# Altium PCB CM5IO_V2.PcbDoc (part 4 of 4)
Units mm, origin at the board's own origin, x right, y up, seen from the top; angles counter-clockwise.
Board outline 160 x 90 mm, 4 copper layers (F.Cu, In1.Cu, In2.Cu, B.Cu); 77 components, 161 nets, 674 pads, 703 vias.
Unrouted connection lines stored in the file: 47.
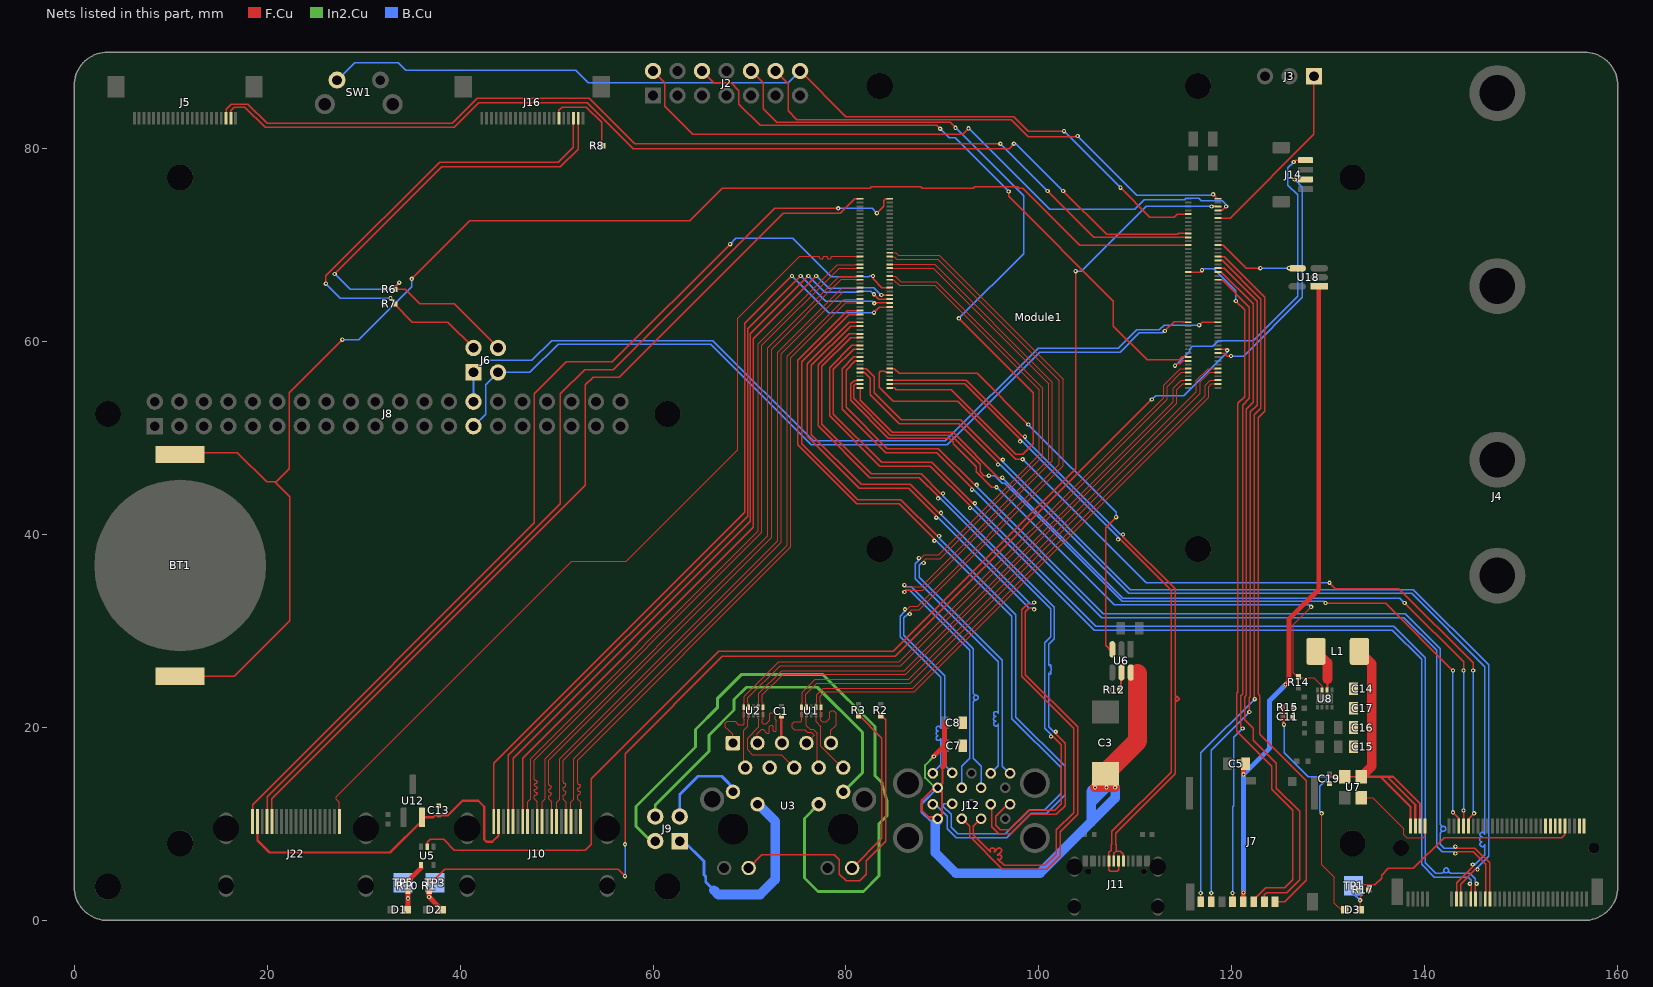
[diagram p5: the nets of this part, all layers, seen from the top]

## Via types
v1: diameter 0.45, hole 0.2, F.Cu to B.Cu, tented both sides, 703 vias

## Nets (pads, with @x,y where several pads share a name; then routed paths per layer and width w, separated by ;. In a path a pad name is that pad's centre, name@x,y a point inside that pad or via, vN(x,y) a via of type N, cw(c..) or ccw(c..) an arc to the next point about the centre after c; other vN are vias at no path point) (continued)
HDMI0_D2_P: J22.1 Module1.170 | length 88.8
  F.Cu w0.127: J22.1@27.5,10.28 27.5,12.23 27.19,12.54 27.19,12.821 51.579,37.21 57.215,37.21 68.79,48.785 68.79,62.421 75.209,68.84 77.11,68.84 77.138,68.837 77.164,68.828 77.188,68.813 77.208,68.793 77.223,68.769 77.232,68.743 77.238,68.687 77.247,68.661 77.262,68.637 77.282,68.617 77.306,68.602 77.332,68.593 77.36,68.59 77.52,68.59 77.548,68.593 77.574,68.602 77.598,68.617 77.618,68.637 77.633,68.661 77.642,68.687 77.648,68.743 77.657,68.769 77.672,68.793 77.692,68.813 77.716,68.828 77.742,68.837 77.77,68.84 77.93,68.84 77.958,68.837 77.984,68.828 78.008,68.813 78.028,68.793 78.043,68.769 78.052,68.743 78.058,68.687 78.067,68.661 78.082,68.637 78.102,68.617 78.126,68.602 78.152,68.593 78.18,68.59 78.34,68.59 78.368,68.593 78.394,68.602 78.418,68.617 78.438,68.637 78.453,68.661 78.462,68.687 78.468,68.743 78.477,68.769 78.492,68.793 78.512,68.813 78.536,68.828 78.562,68.837 78.59,68.84 80.98,68.84 81.02,68.8 Module1.170@81.5,68.8
HDMI0_HOTPLUG: J22.19 Module1.153 | length 102.3
  F.Cu w0.13: J22.19@18.5,10.28 18.5,12 47.7,41.2 47.7,54.6 51,57.9 55.8,57.9 v1(68,70.1) ; v1(82.8,66.8) 82.8,66.482 83.694,65.587 84.076,65.587 84.088,65.6 Module1.153@84.58,65.6
  B.Cu w0.13: v1(68,70.1) 68.6,70.7 74.5,70.7 78.462,66.738 82.42,66.738 82.482,66.8 v1(82.8,66.8)
HDMI0_SCL: J22.15 Module1.200 | length 95.2
  F.Cu w0.13: J22.15@20.5,10.28 20.5,12.6 53,45.1 53,55.5 53.8,56.3 56.5,56.3 73.5,73.3 79.4,73.3 80.9,74.8 Module1.200@81.5,74.8
HDMI0_SDA: J22.16 Module1.199 | length 100.2
  F.Cu w0.13: J22.16@20,10.28 20,12.8 50.4,43.2 50.4,54.6 52.9,57.1 55.9,57.1 72.6,73.8 v1(79.2,73.8) ; v1(83.2,73.3) 83.9,74 83.9,74.6 84.1,74.8 Module1.199@84.58,74.8
  B.Cu w0.13: v1(79.2,73.8) 82.7,73.8 v1(83.2,73.3)
HDMI1_CEC: J10.13 Module1.149 | length 77.7
  F.Cu w0.13: J10.13@46.5,10.28 46.5,16.832 70.4,40.732 70.4,60.3 v1(76.9,66.8) ; v1(83.663,64.82) 83.683,64.8 Module1.149@84.58,64.8
  B.Cu w0.13: v1(76.9,66.8) 78.2,65.5 81.3,65.5 81.4,65.6 82.883,65.6 v1(83.663,64.82)
HDMI1_CK_N: J10.12 Module1.166 | length 73.4
  F.Cu w0.127: J10.12@47,10.28 47,12.29 47.31,12.6 47.31,16.779 70.91,40.379 70.91,59.779 79.091,67.96 80.98,67.96 81.02,68 Module1.166@81.5,68
HDMI1_CK_P: J10.10 Module1.164 | length 73.9
  F.Cu w0.127: J10.10@48,10.28 48,12.29 47.69,12.6 47.69,12.86 47.694,12.893 47.705,12.925 47.723,12.954 47.746,12.977 47.775,12.995 47.807,13.006 47.84,13.01 47.857,13.01 47.89,13.014 47.922,13.025 47.95,13.043 47.974,13.066 47.992,13.095 48.003,13.127 48.007,13.16 48.003,13.193 47.992,13.225 47.974,13.254 47.95,13.277 47.922,13.295 47.89,13.306 47.857,13.31 47.84,13.31 47.807,13.314 47.775,13.325 47.746,13.343 47.723,13.366 47.705,13.395 47.694,13.427 47.69,13.46 47.694,13.493 47.705,13.525 47.723,13.554 47.746,13.577 47.775,13.595 47.807,13.606 47.84,13.61 47.857,13.61 47.89,13.614 47.922,13.625 47.95,13.643 47.974,13.666 47.992,13.695 48.003,13.727 48.007,13.76 48.003,13.793 47.992,13.825 47.974,13.854 47.95,13.877 47.922,13.895 47.89,13.906 47.857,13.91 47.84,13.91 47.807,13.914 47.775,13.925 47.746,13.943 47.723,13.966 47.705,13.995 47.694,14.027 47.69,14.06 47.694,14.093 47.705,14.125 47.723,14.154 47.746,14.177 47.775,14.195 47.807,14.206 47.84,14.21 47.857,14.21 47.89,14.214 47.922,14.225 47.95,14.243 47.974,14.266 47.992,14.295 48.003,14.327 48.007,14.36 48.003,14.393 47.992,14.425 47.974,14.454 47.95,14.477 47.922,14.495 47.89,14.506 47.857,14.51 47.84,14.51 47.807,14.514 47.775,14.525 47.746,14.543 47.723,14.566 47.705,14.595 47.694,14.627 47.69,14.66 47.69,16.621 71.29,40.221 71.29,59.621 79.289,67.62 81,67.62 81.02,67.6 Module1.164@81.5,67.6
HDMI1_D0_N: J10.9 Module1.160 | length 71.5
  F.Cu w0.127: J10.9@48.5,10.28 48.5,12.29 48.81,12.6 48.81,16.779 71.91,39.879 71.91,59.379 79.311,66.78 81,66.78 81.02,66.8 Module1.160@81.5,66.8
HDMI1_D0_P: J10.7 Module1.158 | length 71.4
  F.Cu w0.127: J10.7@49.5,10.28 49.5,12.29 49.19,12.6 49.19,12.81 49.193,12.838 49.202,12.864 49.217,12.888 49.237,12.908 49.261,12.923 49.287,12.932 49.343,12.938 49.369,12.947 49.393,12.962 49.413,12.982 49.428,13.006 49.437,13.032 49.44,13.06 49.44,13.16 49.437,13.188 49.428,13.214 49.413,13.238 49.393,13.258 49.369,13.273 49.343,13.282 49.287,13.288 49.261,13.297 49.237,13.312 49.217,13.332 49.202,13.356 49.193,13.382 49.19,13.41 49.19,13.51 49.193,13.538 49.202,13.564 49.217,13.588 49.237,13.608 49.261,13.623 49.287,13.632 49.343,13.638 49.369,13.647 49.393,13.662 49.413,13.682 49.428,13.706 49.437,13.732 49.44,13.76 49.44,13.86 49.437,13.888 49.428,13.914 49.413,13.938 49.393,13.958 49.369,13.973 49.343,13.982 49.287,13.988 49.261,13.997 49.237,14.012 49.217,14.032 49.202,14.056 49.193,14.082 49.19,14.11 49.19,16.621 72.29,39.721 72.29,59.221 79.509,66.44 80.98,66.44 81.02,66.4 Module1.158@81.5,66.4
HDMI1_D1_N: J10.6 Module1.154 | length 69.5
  F.Cu w0.127: J10.6@50,10.28 50,12.23 50.31,12.54 50.31,16.779 72.91,39.379 72.91,58.879 79.591,65.56 80.911,65.56 80.951,65.6 Module1.154@81.5,65.6
HDMI1_D1_P: J10.4 Module1.152 | length 69.4
  F.Cu w0.127: J10.4@51,10.28 51,12.23 50.69,12.54 50.69,12.91 50.693,12.938 50.702,12.964 50.717,12.988 50.737,13.008 50.761,13.023 50.787,13.032 50.843,13.038 50.869,13.047 50.893,13.062 50.913,13.082 50.928,13.106 50.937,13.132 50.94,13.16 50.94,13.31 50.937,13.338 50.928,13.364 50.913,13.388 50.893,13.408 50.869,13.423 50.843,13.432 50.787,13.438 50.761,13.447 50.737,13.462 50.717,13.482 50.702,13.506 50.693,13.532 50.69,13.56 50.69,13.71 50.693,13.738 50.702,13.764 50.717,13.788 50.737,13.808 50.761,13.823 50.787,13.832 50.843,13.838 50.869,13.847 50.893,13.862 50.913,13.882 50.928,13.906 50.937,13.932 50.94,13.96 50.94,14.11 50.937,14.138 50.928,14.164 50.913,14.188 50.893,14.208 50.869,14.223 50.843,14.232 50.787,14.238 50.761,14.247 50.737,14.262 50.717,14.282 50.702,14.306 50.693,14.332 50.69,14.36 50.69,16.621 73.29,39.221 73.29,58.721 79.779,65.21 80.965,65.21 80.975,65.2 Module1.152@81.5,65.2
HDMI1_D2_N: J10.3 Module1.148 | length 67.5
  F.Cu w0.127: J10.3@51.5,10.28 51.5,12.23 51.81,12.54 51.81,16.779 73.91,38.879 73.91,58.479 79.821,64.39 80.965,64.39 80.975,64.4 Module1.148@81.5,64.4
HDMI1_D2_P: J10.1 Module1.146 | length 67.5
  F.Cu w0.127: J10.1@52.5,10.28 52.5,12.23 52.19,12.54 52.19,12.91 52.194,12.942 52.204,12.973 52.222,13 52.244,13.023 52.272,13.04 52.302,13.051 52.367,13.058 52.397,13.069 52.425,13.086 52.448,13.109 52.465,13.136 52.476,13.167 52.479,13.199 52.479,13.26 52.476,13.292 52.465,13.323 52.448,13.35 52.425,13.373 52.397,13.39 52.367,13.401 52.302,13.408 52.272,13.419 52.244,13.436 52.222,13.459 52.204,13.486 52.194,13.517 52.19,13.549 52.19,13.61 52.194,13.642 52.204,13.673 52.222,13.7 52.244,13.723 52.272,13.74 52.302,13.751 52.367,13.758 52.397,13.769 52.425,13.786 52.448,13.809 52.465,13.836 52.476,13.867 52.479,13.899 52.479,13.96 52.476,13.992 52.465,14.023 52.448,14.05 52.425,14.073 52.397,14.09 52.367,14.101 52.302,14.108 52.272,14.119 52.244,14.136 52.222,14.159 52.204,14.186 52.194,14.217 52.19,14.249 52.19,16.621 74.29,38.721 74.29,58.321 79.969,64 Module1.146@81.5,64
HDMI1_HOTPLUG: J10.19 Module1.143 | length 81.3
  F.Cu w0.13: J10.19@43.5,10.28 43.5,16.3 69.5,42.3 69.5,61.9 v1(74.4,66.8) ; v1(82.9,63) 83.451,63.551 Module1.143@84.531,63.551
  B.Cu w0.13: v1(74.4,66.8) 78.2,63 v1(82.9,63)
HDMI1_SCL: J10.15 Module1.147 | length 78.8
  F.Cu w0.13: J10.15@45.5,10.28 45.5,16.8 70.1,41.4 70.1,60.8 v1(76.1,66.8) ; v1(82.897,64.897) 83.395,64.4 Module1.147@84.58,64.4
  B.Cu w0.13: v1(76.1,66.8) 77.8,65.1 81.268,65.1 81.388,65.22 82.575,65.22 v1(82.897,64.897)
HDMI1_SDA: J10.16 Module1.145 | length 79.5
  F.Cu w0.13: J10.16@45,10.28 45,17.1 69.8,41.9 69.8,61.3 v1(75.3,66.8) ; v1(82.929,63.971) 82.959,64 Module1.145@84.58,64
  B.Cu w0.13: v1(75.3,66.8) 77.9,64.2 82.7,64.2 v1(82.929,63.971)
HDMI_5v: C13.2 J10.18 J22.18 U12.2 | length 33.3
  F.Cu w0.23: J22.18@19,9.3 19,8.3 20.25,7.05 32.75,7.05 U12.2@36.05,10.35 ; U12.2@36.09,10.69 37.225,10.69 37.45,10.915 38.762,10.915 40.247,12.4 41.9,12.4 42.5,11.8 42.5,8.4 42.75,8.15 43.35,8.15 44,8.8 J10.18@44,9.5
ID_SC: J6.1 J8.28 Module1.35 | length 94
  F.Cu w0.13: v1(116.6,61.7) 116.9,62 Module1.35@118.5,62
  B.Cu w0.13: J8.28@41.39,53.77 41.39,56.79 J6.1@41.4,56.8 ; J8.28@41.4,53.73 J6.1@41.4,56.8 ; v1(116.6,61.7) 112.959,61.7 112.485,61.226 110.126,61.226 108.2,59.3 99.9,59.3 90.3,49.7 76.6,49.7 66.2,60.1 49.5,60.1 47.44,58.04 42.64,58.04 J6.1@41.4,56.8
ID_SD: J6.3 J8.27 Module1.36 | length 88.9
  F.Cu w0.13: v1(113.047,61.095) 113.998,62.046 114.889,62.046 114.935,62 Module1.36@115.42,62
  B.Cu w0.13: J8.27@41.39,51.23 42.65,52.49 42.65,55.51 J6.3@43.94,56.8 47.237,56.8 50.157,59.72 65.98,59.72 76.4,49.3 90.5,49.3 100.1,58.9 108.4,58.9 110.396,60.896 112.848,60.896 v1(113.047,61.095)
M2_3v3: C11.2 C14.2 C15.2 C16.2 C17.2 C19.2 D3.2 J4.2 J4.4 J4.12 J4.14 J4.16 J4.18 J4.70 J4.72 J4.74 L1.2 R15.2 U7.1 U7.4 | length 70.4
  F.Cu w0.127: v1(129.3,11.1) 129.3,5.8 130.6,4.5 130.6,1.8 131.3,1.1 D3.2@131.713,1.1
  F.Cu w0.13: 130.1,15.16 130.36,14.9 v1(130.8,14.9) U7.1@131.7,14.9 U7.4@133.4,14.9 136.7,14.9
  F.Cu w0.23: 125.315,22.1 125.315,21.1 125.315,20.385 v1(125.4,20.3) ; U7.4@133.4,14.9 135.4,14.9 ; J4.74@138.5,9.775 138.5,11.8 135.4,14.9 ; J4.72@139,9.775 139,12 136.1,14.9 ; J4.70@139.5,9.775 139.5,12.1 136.7,14.9 136.1,14.9 ; 135.4,14.9 136.1,14.9
  F.Cu w1: L1.2@133.2,27.9 134.5,26.6 134.5,26.2 134.5,18 134.5,16 U7.4@133.4,14.9
  B.Cu w0.13: v1(125.4,20.3) 125.4,17.4 127.9,14.9 v1(130.8,14.9) 130.1,14.9 129.1,13.9 129.1,11.3 v1(129.3,11.1)
NetC1_2: C1.2 U3.4 U3.5 | length 2.8
  F.Cu w0.23: U3.5@73.3,18.46 C1.2@73.3,21.225
NetD1_1: D1.1 R10.2 TP5.1 | length 3.3
  F.Cu w0.5: D1.1@34.15,1.1 34.6,1.55 v1(34.6,2.3) R10.2@34.6,3.016 R10.2@34.6,3.115
  B.Cu w0.23: v1(34.6,2.3) TP5.1@34.6,3.4
NetD2_1: D2.1 R1.2 TP3.1 | length 3.3
  F.Cu w0.5: R1.2@36.8,3.115 R1.2@36.8,3.016 v1(36.8,2.438) 37.8,1.438 D2.1@37.8,1.1
  B.Cu w0.23: v1(36.8,2.438) TP3.1@36.8,3.288
NetD3_1: D3.1 R17.2 TP1.1 | length 2.7
  F.Cu w0.127: D3.1@133.288,1.1 133.288,2.403 133.6,2.715
  B.Cu w0.23: TP1.1@132.6,2.788 v1(133.288,2.1)
NetJ4_10: J4.10 R17.1 | length 24.1
  F.Cu w0.13: 133.6,3.685 134.785,3.685 135.5,4.4 135.5,4.7 136.2,5.4 138.8,5.4 142,8.6 154.2,8.6 154.5,8.9 J4.10@154.5,9.775
NetJ4_68: J4.68 U7.3 | length 9.7
  F.Cu w0.127: U7.3@133.4,12.7 134.6,12.7 137.8,9.5 137.8,8.9 138.1,8.6 139.8,8.6 140,8.8 J4.68@140,9.775
NetJ16_17: J16.17 R8.2 | length 8.5
  F.Cu w0.13: J16.17@50.25,83.15 50.25,83.95 50.6,84.3 53.1,84.3 54.7,82.7 R8.2@54.7,80.3
NetL1_1: L1.1 U8.6 | length 4.5
  F.Cu w0.23: U8.6@129.85,23.9 129.85,24.15 129.9,24.2 129.9,25
  F.Cu w1: L1.1@128.7,27.9 129.9,26.7 129.9,25
NetModule1_21: Module1.21 R1.1 | length 114.7
  F.Cu w0.13: R1.1@36.8,4.085 37.185,4.085 38.4,5.3 56.4,5.3 v1(57.1,4.6) ; v1(57.1,7.9) 57.1,17.3 67.2,27.4 85.1,27.4 v1(111.7,54) ; Module1.21@118.5,59.2 119.4,59.2 v1(119.5,59.1)
  B.Cu w0.13: v1(57.1,4.6) v1(57.1,7.9) ; v1(111.7,54) 112.1,54.4 115,54.4 119.5,58.9 v1(119.5,59.1)
NetR2_2: R2.2 U3.16 | length 32.6
  F.Cu w0.13: U3.16@69.91,5.44 71.27,6.8 78.8,6.8 79.3,6.3 79.3,4.8 80,4.1 81.4,4.1 82.1,4.8 82.1,6.2 84.1,8.2 84.1,20.8 R2.2@83.6,21.3
NetR3_2: R3.2 U3.18 | length 18.1
  F.Cu w0.13: U3.18@80.63,5.44 83.7,8.51 83.7,18.9 R3.2@81.3,21.3
NetR10_1: R10.1 U5.4 | length 2.2
  F.Cu w0.23: U5.4@35.95,5.435 U5.4@35.95,5.75
  F.Cu w0.5: R10.1@34.6,4.085 U5.4@35.95,5.435
NetR12_1: R12.1 U6.5 | length 3.3
  F.Cu w0.13: R12.1@108.5,24.115 U6.5@108.5,25.6
  F.Cu w0.23: R12.1@108.31,23.9 108.5,24.09 U6.5@108.5,25.6
nPWR_LED: Module1.95 U5.2 | length 126.6
  F.Cu w0.13: U5.2@36.6,7.65 36.6,8.105 36.895,8.4 38.3,8.4 39.4,7.3 53,7.3 53.6,7.9 53.6,14.7 66.8,27.9 84.9,27.9 103.8,46.8 v1(103.8,67.3) ; v1(117.9,74) Module1.95@118.5,74
  B.Cu w0.13: v1(103.8,67.3) 104.4,67.3 111.1,74 115.921,74 115.926,73.995 116.274,73.995 116.279,74 v1(117.9,74)
nRPIBOOT: J2.2 Module1.93 | length 69.2
  F.Cu w0.13: J2.2@60,88.04 61.24,86.8 61.24,84.36 64.1,81.5 92.1,81.5 v1(92.7,82.1) ; Module1.93@118.54,73.6 119,73.6 v1(119.4,74)
  B.Cu w0.13: v1(92.7,82.1) 101.1,73.7 109.9,73.7 110.9,74.7 115.1,74.7 115.235,74.835 116.565,74.835 116.8,74.6 119,74.6 119.4,74.2 v1(119.4,74)
PCIE_CLK_N: J4.53 Module1.112 | length 103.8
  F.Cu w0.147: Module1.112@81.5,57.2 82.075,57.2 82.925,56.35 82.925,54.675 85.7,51.9 91.883,51.9 96.034,47.749 v1(96.249,47.749) ; J4.53@143.7,2.9 143.7,3.767 145.234,5.301 v1(145.449,5.301)
  B.Cu w0.147: v1(96.249,47.749) 96.249,47.534 109.483,34.3 138.783,34.3 146.6,26.483 146.6,6.667 145.449,5.516 v1(145.449,5.301)
PCIE_CLK_P: J4.55 Module1.110 | length 105.4
  F.Cu w0.147: Module1.110@81.5,56.8 81.9,56.8 82.525,56.175 82.525,54.475 85.5,51.5 91.717,51.5 95.751,47.466 v1(95.751,47.251) ; J4.55@143.3,2.9 143.3,3.933 144.951,5.584 v1(144.951,5.799)
  B.Cu w0.147: v1(95.751,47.251) 95.966,47.251 109.317,33.9 138.617,33.9 146.2,26.317 146.2,8.9 ccw(c145.95,8.9) 145.95,8.65 145.911,8.65 ccw(c145.911,8.4) 145.661,8.4 ccw(c145.911,8.4) 145.911,8.15 145.95,8.15 ccw(c145.95,7.9) 146.2,7.9 146.2,6.833 145.166,5.799 v1(144.951,5.799)
PCIE_nCLKREQ: J4.52 Module1.102 | length 92.1
  F.Cu w0.13: Module1.102@81.5,55.2 81.5,53.9 84.8,50.6 91.1,50.6 95.8,45.9 v1(96.2,45.9) ; v1(137.9,32.9) 144,26.8 v1(144,25.9) ; J4.52@144,9.775 v1(144,11.4)
  B.Cu w0.13: v1(96.2,45.9) 108.7,33.4 137.4,33.4 v1(137.9,32.9) ; v1(144,11.4) v1(144,25.9)
PCIE_nRST: J4.50 Module1.109 | length 93.4
  F.Cu w0.13: v1(130.1,35) 130.7,34.4 137.3,34.4 145,26.7 v1(145,25.9) ; J4.50@144.5,9.775 144.5,10.5 v1(145.1,11.1)
  F.Cu w0.147: Module1.109@84.58,56.8 84.125,56.8 84.025,56.9 83.575,56.9 83.425,56.75 83.425,55.275 84.9,53.8 91.6,53.8 97.6,47.8 v1(98.3,47.8)
  B.Cu w0.13: 126.5,35 v1(130.1,35) ; v1(145,25.9) 145,12.4 145.015,12.385 145.015,11.185 v1(145.1,11.1)
  B.Cu w0.147: v1(98.3,47.8) 111.1,35 126.5,35
PCIE_nWAKE: J4.54 Module1.104 | length 92.7
  F.Cu w0.13: Module1.104@81.46,55.6 81,55.6 80.8,55.4 80.8,54.1 84.6,50.3 90.9,50.3 93.9,47.3 93.9,46.5 94.3,46.1 v1(94.8,46.1) ; v1(129.7,32.9) 129.72,32.88 135.92,32.88 v1(142.9,25.9) ; v1(142.9,11.2) 143.5,10.6 J4.54@143.5,9.775
  B.Cu w0.13: v1(94.8,46.1) 95.4,46.1 96.2,45.3 96.439,45.3 108.639,33.1 129.5,33.1 v1(129.7,32.9) ; v1(142.9,11.2) v1(142.9,25.9)
PCIE_PWR_EN: Module1.106 R14.2 U8.7 | length 71.3
  F.Cu w0.127: R14.2@126.83,25.17 126.344,25.657 126.344,30.644 v1(128.2,32.5) ; R14.2@126.9,25.17 128.457,25.17 129.35,24.277 U8.7@129.35,23.9
  F.Cu w0.13: Module1.106@81.46,56 81.415,55.955 80.855,55.955 80.5,55.6 80.5,53.9 84.4,50 90.7,50 91.1,49.6 91.1,49.4 93.5,47 93.5,46.5 95.1,44.9 v1(95.6,44.9)
  B.Cu w0.13: v1(95.6,44.9) 107.8,32.7 128,32.7 v1(128.2,32.5)
PCIE_RX_N: J4.43 Module1.118 | length 107.9
  F.Cu w0.147: Module1.118@81.46,58.4 80.817,58.4 79.6,57.183 79.6,53 84.1,48.5 89.411,48.5 93.05,44.86 v1(93.05,44.646) ; v1(143.143,6.949) 143.295,7.1 145.017,7.1 146.3,5.817 J4.43@146.3,2.9
  B.Cu w0.147: v1(93.05,44.646) 93.264,44.646 106.511,31.4 137.817,31.4 141.2,28.017 141.2,7.717 141.817,7.1 142.992,7.1 v1(143.143,6.949)
PCIE_RX_P: J4.41 Module1.116 | length 109.4
  F.Cu w0.147: Module1.116@81.46,58 80.983,58 80,57.017 80,53.2 84.3,48.9 89.576,48.9 93.333,45.143 v1(93.547,45.143) ; v1(143.143,7.652) 143.295,7.5 145.183,7.5 146.7,5.983 J4.41@146.7,2.9
  B.Cu w0.147: v1(93.547,45.143) 93.547,44.929 106.676,31.8 137.983,31.8 141.6,28.183 141.6,10 ccw(c141.85,10) 141.85,9.75 141.896,9.75 ccw(c141.896,9.5) 142.146,9.5 ccw(c141.896,9.5) 141.896,9.25 141.85,9.25 ccw(c141.85,9) 141.6,9 141.6,7.883 141.983,7.5 142.992,7.5 v1(143.143,7.652)
PCIE_TX_N: J4.49 Module1.124 | length 109.5
  F.Cu w0.147: Module1.124@81.46,59.6 80.617,59.6 78.3,57.283 78.3,52.317 83.517,47.1 88.712,47.1 92.851,42.961 v1(92.851,42.746) ; v1(144.649,3.807) 144.8,3.656 J4.49@144.8,2.9
  B.Cu w0.147: v1(92.851,42.746) 93.065,42.746 105.712,30.1 136.617,30.1 139.65,27.067 139.65,5.817 140.967,4.5 144.467,4.5 144.8,4.167 144.8,3.959 v1(144.649,3.807)
PCIE_TX_P: J4.47 Module1.122 | length 111.1
  F.Cu w0.147: Module1.122@81.46,59.2 80.783,59.2 78.7,57.117 78.7,52.483 83.683,47.5 88.877,47.5 93.134,43.244 v1(93.348,43.244) ; J4.47@145.2,2.9 145.2,3.656 v1(145.351,3.807)
  B.Cu w0.147: v1(93.348,43.244) 93.348,43.029 105.877,30.5 136.783,30.5 140.05,27.233 140.05,5.983 141.133,4.9 141.15,4.9 141.7,4.9 ccw(c141.7,5.15) 141.95,5.15 141.95,5.196 ccw(c142.2,5.196) 142.2,5.446 ccw(c142.2,5.196) 142.45,5.196 142.45,5.15 ccw(c142.7,5.15) 142.7,4.9 144.633,4.9 145.2,4.333 145.2,3.959 v1(145.351,3.807)
PMIC_ENABLE: J2.12 Module1.99 | length 53.1
  F.Cu w0.13: J2.12@72.7,88.04 74,86.74 74,83.9 74.9,83 97.1,83 98.9,81.2 103.9,81.2 v1(104,81.3) ; v1(118.05,75.25) Module1.99@118.5,74.8
  B.Cu w0.13: v1(104,81.3) 110.12,75.18 117.98,75.18 v1(118.05,75.25)
PWM: J14.2 Module1.19 | length 25.1
  F.Cu w0.13: Module1.19@118.54,58.8 119.206,58.8 119.506,58.5 v1(119.9,58.5) ; v1(126.5,76.8) J14.2@127.625,76.8
  B.Cu w0.13: v1(119.9,58.5) 121.2,58.5 127.3,64.6 127.3,76 v1(126.5,76.8)
PWR_BUT: J2.14 Module1.92 SW1.1 | length 96.7
  F.Cu w0.13: J2.14@75.24,88.04 79.98,83.3 97.4,83.3 98.9,81.8 v1(102.6,81.8) ; v1(108.45,75.95) 111.5,72.9 114.03,72.9 114.33,73.2 Module1.92@115.42,73.2
  B.Cu w0.13: SW1.1@27.25,87.1 27.3,87.1 29.1,88.9 33.6,88.9 34.4,88.1 52,88.1 53.3,86.8 74,86.8 J2.14@75.24,88.04 ; v1(102.6,81.8) v1(108.45,75.95)
SCL0: J5.20 Module1.80 | length 108.7
  F.Cu w0.13: J5.20@15.75,83.15 15.75,84.05 16.3,84.6 18,84.6 20,82.6 39.2,82.6 41.8,85.2 53.4,85.2 58.1,80.5 v1(96,80.5) ; v1(100.9,75.6) 105.7,70.8 Module1.80@115.42,70.8
  B.Cu w0.13: v1(96,80.5) v1(100.9,75.6)
SCL1: J6.2 J16.20 R7.1 | length 52.9
  F.Cu w0.13: v1(26.1,66) 26.1,66.8 37.9,78.6 50.2,78.6 51.75,80.15 J16.20@51.75,83.15 ; v1(32.8,64.5) R7.1@33.17,64.13 ; R7.1@33.17,63.9 35.07,62 38.74,62 J6.2@41.4,59.34
  B.Cu w0.13: v1(26.1,66) 27.6,64.5 v1(32.8,64.5)
SD_CLK: J7.5 Module1.57 | length 67
  F.Cu w0.13: Module1.57@118.5,66.4 118.97,66.4 121.8,63.57 121.8,54.1 121.1,53.4 121.1,23.455 120.92,23.275 120.92,20.08 v1(121.1,19.9) ; v1(120.05,2.85) 120.06,2.84 J7.5@120.06,1.925
  B.Cu w0.13: v1(120.05,2.85) 120.1,2.9 120.1,11.8 120.2,11.9 120.2,19 v1(121.1,19.9)
SD_CMD: J7.3 Module1.62 | length 75.2
  F.Cu w0.13: Module1.62@115.42,67.2 116.7,67.2 v1(116.9,67.4) ; v1(120.4,64.2) 121.3,63.3 121.3,54.3 120.6,53.6 120.6,23.65 120.5,23.55 120.5,19.6 124.1,16 124.1,13.6 126.3,11.4 126.3,4.2 125.482,3.383 123.517,3.383 J7.3@122.26,2.125
  B.Cu w0.13: v1(116.9,67.4) 117.06,67.56 118.108,67.56 120.4,65.268 v1(120.4,64.2)
SD_DAT0: J7.7 Module1.63 | length 69.8
  F.Cu w0.13: v1(117.85,2.85) 117.86,2.84 J7.7@117.86,1.925 ; Module1.63@118.5,67.6 119.2,67.6 122.6,64.2 122.6,53.4 121.9,52.7 121.9,23.2 121.8,23.1 v1(121.8,21.606)
  B.Cu w0.13: v1(117.85,2.85) 117.85,17.65 121.8,21.6 v1(121.8,21.606)
SD_DAT1: J7.8 Module1.67 | length 71.3
  F.Cu w0.13: J7.8@116.76,1.925 v1(116.76,2.85) ; Module1.67@118.5,68.4 119,68.4 123,64.4 123,53.1 122.3,52.4 122.3,23 v1(122.36,22.94)
  B.Cu w0.13: v1(116.76,2.85) 116.76,17.36 122.34,22.94 v1(122.36,22.94)
SD_DAT2: J7.1 Module1.69 | length 73.6
  F.Cu w0.13: Module1.69@118.5,68.8 119.2,68.8 123.4,64.6 123.4,52.8 122.7,52.1 122.7,23.5 122.9,23.3 122.9,19.3 127.7,14.5 127.7,4.15 125.475,1.925 J7.1@124.46,1.925
SD_DAT3: J7.2 Module1.61 | length 72.5
  F.Cu w0.13: Module1.61@118.5,67.2 118.9,67.2 122.2,63.9 122.2,53.7 121.5,53 121.5,23.321 121.3,23.121 121.3,20.8 122.2,19.9 122.2,18.7 124.6,16.3 124.6,13.7 127,11.3 127,4.2 125.7,2.9 123.6,2.9 123.36,2.66 J7.2@123.36,1.925
SD_PWR: C5.2 J7.4 U18.1 | length 67.9
  F.Cu w0.5: J7.4@121.16,1.925 121.16,2.86 v1(121.2,2.9) ; v1(121.2,15.15) C5.2@121.2,16.063 ; v1(125.55,24.45) 125.9,24.8 125.9,31.2 129,34.3 U18.1@129,65.7
  B.Cu w0.5: v1(121.2,2.9) v1(121.2,15.15) 123.9,17.85 123.9,22.8 v1(125.55,24.45)
SD_PWR_ON: Module1.75 U18.4 | length 9.3
  F.Cu w0.13: Module1.75@118.5,70 119.1,70 121.5,67.6 v1(122.945,67.6) ; v1(125.9,67.6) U18.4@126.8,67.6
  B.Cu w0.13: v1(122.945,67.6) v1(125.9,67.6)
SDA0: J5.21 Module1.82 | length 108.1
  F.Cu w0.13: J5.21@16.25,83.15 16.25,83.93 16.62,84.3 17.7,84.3 19.8,82.2 39.4,82.2 41.96,84.76 53.184,84.76 57.944,80 96.9,80 v1(97.4,80.5) ; v1(102.5,75.6) 107,71.1 108,71.1 108.005,71.105 114.388,71.105 114.483,71.2 Module1.82@115.42,71.2
  B.Cu w0.13: v1(97.4,80.5) 97.6,80.5 v1(102.5,75.6)
SDA1: J6.4 J16.21 R6.1 | length 55.5
  F.Cu w0.13: v1(27,67) 38.1,78.1 50.4,78.1 52.25,79.95 J16.21@52.25,83.15 ; R6.1@33.17,65.4 34.3,65.4 35.8,63.9 39.38,63.9 J6.4@43.94,59.34 ; R6.1@33.17,65.57 v1(33.7,66.1)
  B.Cu w0.13: v1(27,67) 28.6,65.4 33,65.4 v1(33.7,66.1)
SYNC_OUT: J2.6 Module1.18 | length 65.5
  F.Cu w0.13: J2.6@65.08,88.04 66.32,86.8 68.1,86.8 68.9,86 68.9,84.6 71.1,82.4 89.4,82.4 v1(89.75,82.05) ; v1(96.85,75.55) 96.85,75.05 107.7,64.2 107.7,61.6 111.2,58.1 114.526,58.1 114.826,58.4 Module1.18@115.42,58.4
  B.Cu w0.13: v1(89.75,82.05) 90.7,81.1 91.3,81.1 v1(96.85,75.55)
TACHO: J14.4 Module1.16 | length 33.2
  F.Cu w0.13: v1(114.1,57.5) 114.3,57.7 114.593,57.7 114.893,58 Module1.16@115.42,58 ; v1(126.4,78.6) 126.6,78.8 J14.4@127.625,78.8
  B.Cu w0.13: v1(114.1,57.5) 115.6,59 115.6,59.2 115.9,59.5 118,59.5 118.6,60.1 122.2,60.1 126.8,64.7 126.8,75.2 125.8,76.2 125.8,78 v1(126.4,78.6)
TR0_TAP: J9.3 U3.11 | length 9.4
  B.Cu w0.3: J9.3@62.77,10.77 62.77,13.07 64.65,14.95 67.119,14.95 U3.11@68.512,13.557
TR1_TAP: J9.1 U3.12 | length 22.3
  B.Cu w0.3: J9.1@62.77,8.23 63.17,8.23 65.3,6.1 65.3,4.7 65.47,4.53 65.47,3.98 66.3,3.15
  B.Cu w1: 66.3,3.15 66.75,2.7 71.1,2.7 72.65,4.25 72.65,10.3 U3.12@71.05,11.9
TR2_TAP: J9.2 U3.13 | length 72.4
  In2.Cu w0.3: J9.2@60.23,8.23 59.77,8.23 58.23,9.77 58.23,11.811 64.4,17.981 64.4,19.8 66.7,22.1 66.7,23.038 69.137,25.475 77.625,25.475 83,20.1 83,15 83.73,14.27 83.73,14.089 84.275,12.367 84.275,10.875 83.4,10 83.4,4.6 81.8,3 77.1,3 75.7,4.4 75.7,10.585 U3.13@77.175,12.06
TR3_TAP: J9.4 U3.14 | length 38.3
  In2.Cu w0.3: J9.4@60.23,10.77 60.23,11.972 65.8,17.542 65.8,19.2 68.4,21.8 68.4,22.9 69.675,24.175 77.025,24.175 81.7,19.5 81.7,15.315 U3.14@79.715,13.33
TRD0_N: Module1.10 U2.4 U3.2 | length 67.5
  F.Cu w0.127: U3.2@69.4,16.005 69.4,19.7 69.84,20.14 69.84,20.858 69.9,20.918 69.9,21.33 69.9,21.743 69.84,21.803 U2.4@69.84,21.915 ; U2.4@69.9,22.1 69.9,22.513 69.84,22.573 69.84,23.071 73.179,26.41 85.679,26.41 113.29,54.021 113.29,55.321 114.769,56.8 Module1.10@115.46,56.8
TRD0_P: Module1.12 U2.5 U3.1 | length 68.2
  F.Cu w0.127: U3.1@68.285,18.39 68.285,19.285 67.82,19.75 67.8,19.75 67.5,20.05 67.5,20.45 67.7,20.65 68.5,20.65 68.85,20.3 69.35,20.3 69.46,20.41 69.46,20.46 69.46,20.858 69.4,20.918 69.4,21.33 69.4,21.743 69.46,21.803 U2.5@69.46,21.915 ; U2.5@69.4,22.1 69.4,22.513 69.46,22.573 69.46,23.229 73.021,26.79 85.521,26.79 112.91,54.179 112.91,55.479 114.631,57.2 Module1.12@115.46,57.2
TRD1_N: Module1.6 U2.2 U3.6 | length 70.5
  F.Cu w0.127: U2.2@70.9,22.1 70.9,22.513 70.96,22.573 70.96,23.529 73.321,25.89 86.021,25.89 113.91,53.779 113.91,55.179 114.721,55.99 114.885,55.99 114.895,56 Module1.6@115.42,56 ; U2.2@70.96,21.915 70.96,21.803 70.9,21.743 70.9,21.33 70.9,20.918 70.96,20.858 70.96,20.06 69.8,18.9 69.8,17.7 70.3,17.2 73.285,17.2 U3.6@74.635,15.85
TRD1_P: Module1.4 U2.1 U3.3 | length 69.7
  F.Cu w0.127: U3.3@70.825,18.39 70.825,19.375 71.25,19.8 71.4,19.8 71.8,19.4 72,19.4 72.05,19.45 72.05,20.1 72.2,20.25 72.35,20.25 72.45,20.15 72.45,19.65 72.5,19.6 72.65,19.6 72.7,19.6 72.75,19.65 72.75,20.75 72.65,20.85 72.65,21.45 72.55,21.55 72.2,21.55 72.1,21.45 72.1,20.75 71.75,20.4 71.45,20.4 71.34,20.51 71.34,20.858 71.4,20.918 71.4,21.33 71.4,21.743 71.34,21.803 U2.1@71.34,21.915 ; U2.1@71.4,22.1 71.4,22.513 71.34,22.573 71.34,23.371 73.479,25.51 86.179,25.51 114.29,53.621 114.29,55.021 114.879,55.61 114.885,55.61 114.895,55.6 Module1.4@115.42,55.6
TRD2_N: Module1.9 U1.4 U3.8 | length 65.1
  F.Cu w0.127: U1.4@75.84,21.915 75.84,21.803 75.9,21.743 75.9,21.33 75.9,20.2 76.3,19.8 76.6,19.8 77,19.4 U3.8@77,16.025 ; U1.4@75.9,22.1 75.9,22.513 75.84,22.573 75.84,23.471 76.979,24.61 86.679,24.61 116.69,54.621 116.69,55.821 117.679,56.81 117.965,56.81 117.975,56.8 Module1.9@118.5,56.8
TRD2_P: Module1.11 U1.5 U3.7 | length 65.7
  F.Cu w0.127: U1.5@75.4,22.1 75.4,22.513 75.46,22.573 75.46,23.629 76.821,24.99 86.521,24.99 116.31,54.779 116.31,55.979 117.521,57.19 117.965,57.19 117.975,57.2 Module1.11@118.5,57.2 ; U1.5@75.46,21.915 75.46,21.803 75.4,21.743 75.4,21.33 75.4,20.7 75.3,20.6 74.65,20.6 74.45,20.4 74.45,19.95 74.65,19.75 75.75,19.75 76,19.5 76.4,19.5 76.7,19.2 76.7,19.185 U3.7@75.905,18.39
TRD3_N: Module1.5 U1.2 U3.10 | length 64.2
  F.Cu w0.127: U1.2@76.9,22.1 76.9,22.513 76.96,22.573 76.96,23.412 77.638,24.09 86.921,24.09 117.21,54.379 117.21,55.479 117.731,56 Module1.5@118.5,56 ; U1.2@76.96,21.915 76.96,21.803 76.9,21.743 76.9,21.33 76.9,20.6 77.4,20.1 77.4,18.036 U3.10@79.586,15.85
TRD3_P: Module1.3 U1.1 U3.9 | length 63.5
  F.Cu w0.127: U1.1@77.34,21.915 77.34,21.803 77.4,21.743 77.4,21.33 77.4,20.75 77.55,20.6 77.95,20.6 78.3,20.95 78.3,21.6 78.45,21.75 78.75,21.75 79,21.5 79,20.25 78.445,19.695 U3.9@78.445,18.39 ; U1.1@77.4,22.1 77.4,22.513 77.34,22.573 77.34,23.254 77.796,23.71 87.079,23.71 117.59,54.221 117.59,55.321 117.869,55.6 Module1.3@118.5,55.6
USB2_N: J11.A7 J11.B7 Module1.103 | length 71.9
  F.Cu w0.147: Module1.103@84.58,55.6 92.317,55.6 98.053,49.865 v1(98.053,49.653) ; v1(108.2,39.5) 108.417,39.5 113.7,34.217 113.7,15.383 107.55,9.233 107.55,7.894 107.5,7.844 107.5,7.3 107.25,7.05 J11.B7@107.25,6.155 107.25,5.25 107.4,5.1 108.1,5.1 108.25,5.25 J11.A7@108.25,6.155
  B.Cu w0.147: v1(98.053,49.653) 98.265,49.653 108.2,39.717 v1(108.2,39.5)
USB2_P: J11.A6 J11.B6 Module1.105 | length 73
  F.Cu w0.147: Module1.105@84.58,56 85.321,56 ; 85.321,56 92.483,56 98.335,50.147 v1(98.547,50.147) ; J11.A6@107.75,6.155 107.75,6.95 108,7.2 ; v1(108.7,40) 108.7,39.783 114.1,34.383 114.1,23.425 ccw(c114.313,23.425) 114.313,23.213 ccw(c114.313,23) 114.525,23 114.525,22.925 ccw(c114.313,22.925) 114.313,22.713 ccw(c114.313,22.5) 114.1,22.5 114.1,15.217 107.95,9.067 107.95,7.894 108,7.844 108,7.2 ; J11.B6@108.75,6.155 108.75,6.85 108.4,7.2 108,7.2
  B.Cu w0.147: v1(98.547,50.147) 98.547,49.935 108.483,40 v1(108.7,40)
USB3-0-D_N: J12.A2 Module1.136 | length 88.8
  F.Cu w0.147: Module1.136@81.46,62 80.317,62 76,57.683 76,50.195 81.395,44.8 86.517,44.8 89.351,41.966 v1(89.351,41.751) ; J12.A2@92,10.55 92.8,9.75 92.8,8.717 96.217,5.3 100.783,5.3 102.2,6.717 102.2,9.217 104,11.017 104,20.083 98.6,25.483 98.6,32.017 98.983,32.4 99.349,32.4 v1(99.5,32.249)
  B.Cu w0.147: v1(89.351,41.751) 89.566,41.751 98.917,32.4 99.349,32.4 v1(99.5,32.249)
USB3-0-D_P: J12.A3 Module1.134 | length 89.9
  F.Cu w0.147: Module1.134@81.46,61.6 80.483,61.6 76.4,57.517 76.4,50.361 81.561,45.2 86.683,45.2 89.634,42.249 v1(89.849,42.249) ; J12.A3@94,10.55 93.2,9.75 93.2,8.883 94.991,7.091 cw(c95.168,7.268) 95.345,7.091 95.699,7.445 cw(c95.875,7.268) 96.052,7.445 cw(c95.875,7.268) 96.052,7.091 95.699,6.738 cw(c95.875,6.561) 95.699,6.384 96.383,5.7 100.617,5.7 101.8,6.883 101.8,9.383 103.6,11.183 103.6,19.917 98.2,25.317 98.2,32.183 98.817,32.8 99.349,32.8 v1(99.5,32.952)
  B.Cu w0.147: v1(89.849,42.249) 89.849,42.034 99.083,32.8 99.349,32.8 v1(99.5,32.952)
USB3-0-RX_N: J12.A6 Module1.128 | length 77.4
  F.Cu w0.147: Module1.128@81.46,60.4 80.483,60.4 77.5,57.417 77.5,51.432 82.632,46.3 87.783,46.3 89.834,44.249 v1(90.049,44.249) ; J12.A6@95,12.05 95.1,11.95 95.1,9.717 95.817,9 97.083,9 99.083,11 101.783,11 102.7,11.917 102.7,18.383 101.736,19.347 v1(101.736,19.561)
  B.Cu w0.147: v1(90.049,44.249) 90.049,44.034 101.6,32.483 101.6,29.217 101,28.617 101,26.4 cw(c101.124,26.4) 101.124,26.276 cw(c101.124,26.152) 101.248,26.152 101.248,25.9 cw(c101.124,25.9) 101.124,25.776 cw(c101.124,25.652) 101,25.652 101,20.083 101.522,19.561 v1(101.736,19.561)
USB3-0-RX_P: J12.A5 Module1.130 | length 76.5
  F.Cu w0.147: Module1.130@81.46,60.8 80.317,60.8 77.1,57.583 77.1,51.266 82.466,45.9 87.617,45.9 89.551,43.966 v1(89.551,43.751) ; J12.A5@97,12.05 96.75,12.05 95.5,10.8 95.5,9.883 95.983,9.4 96.917,9.4 98.9,11.383 98.9,11.4 101.617,11.4 102.3,12.083 102.3,18.217 101.453,19.064 v1(101.239,19.064)
  B.Cu w0.147: v1(89.551,43.751) 89.766,43.751 101.2,32.317 101.2,29.383 100.6,28.783 100.6,19.917 101.239,19.278 v1(101.239,19.064)
USB3-0-TX_N: J12.A9 Module1.140 | length 85
  F.Cu w0.147: Module1.140@81.46,62.8 80.283,62.8 75.4,57.917 75.4,49.4 81.2,43.6 85.683,43.6 89.434,39.849 v1(89.649,39.849)
  B.Cu w0.147: J12.A9@89.267,12.05 J12.A9@89,12.05 89.275,12.05 90.5,10.825 90.5,9.517 91.417,8.6 96.683,8.6 99.183,11.1 100.783,11.1 102.7,13.017 102.7,15.983 97.6,21.083 97.6,31.683 89.649,39.634 v1(89.649,39.849)
USB3-0-TX_P: J12.A8 Module1.142 | length 84.5
  F.Cu w0.147: Module1.142@81.46,63.2 80.117,63.2 75,58.083 75,49.3 81.1,43.2 85.517,43.2 89.151,39.566 v1(89.151,39.351)
  B.Cu w0.147: v1(89.151,39.351) 89.366,39.351 97.2,31.517 97.2,20.917 102.3,15.817 102.3,13.183 100.617,11.5 99.017,11.5 96.517,9 91.583,9 90.9,9.683 90.9,10.991 90.1,11.791 90.1,12 90.2,12.1 J12.A8@91,12.1
USB3-1-D_N: J12.B2 Module1.165 | length 75
  F.Cu w0.127: Module1.165@84.58,68 85.105,68 85.115,67.99 89.179,67.99 101.39,55.779 101.39,47.621 87.979,34.21 86.208,34.21 v1(86.047,34.049)
  B.Cu w0.147: v1(86.047,34.049) 86.198,34.2 86.617,34.2 92.8,28.017 92.8,16.8 92,16 J12.B2@92,13.75
USB3-1-D_P: J12.B3 Module1.163 | length 76.5
  F.Cu w0.127: Module1.163@84.58,67.6 85.105,67.6 85.115,67.61 89.021,67.61 101.01,55.621 101.01,47.779 87.821,34.59 86.208,34.59 v1(86.047,34.752)
  B.Cu w0.147: v1(86.047,34.752) 86.198,34.6 86.783,34.6 93.2,28.183 93.2,23.6 ccw(c93.45,23.6) 93.45,23.35 93.463,23.35 ccw(c93.463,23.1) 93.713,23.1 ccw(c93.463,23.1) 93.463,22.85 93.45,22.85 ccw(c93.45,22.6) 93.2,22.6 93.2,16.8 94,16 J12.B3@94,13.75
USB3-1-RX_N: J12.B6 Module1.157 | length 72.3
  F.Cu w0.127: Module1.157@84.54,66.4 84.911,66.4 84.921,66.41 85.521,65.81 89.221,65.81 100.01,55.021 100.01,48.279 89.621,37.89 88.121,37.89 87.78,37.549 v1(87.551,37.549)
  B.Cu w0.147: v1(87.551,37.549) 87.551,37.334 87.2,36.983 87.2,35.417 95.8,26.817 95.8,21.4 ccw(c95.55,21.4) 95.55,21.15 95.536,21.15 ccw(c95.536,20.9) 95.286,20.9 ccw(c95.536,20.9) 95.536,20.65 95.55,20.65 ccw(c95.55,20.4) 95.8,20.4 95.8,16.05 J12.B6@95,15.25
USB3-1-RX_P: J12.B5 Module1.159 | length 70.8
  F.Cu w0.127: Module1.159@84.55,66.79 85.079,66.79 85.679,66.19 89.379,66.19 100.39,55.179 100.39,48.121 89.779,37.51 88.279,37.51 88.049,37.28 v1(88.049,37.051)
  B.Cu w0.147: v1(88.049,37.051) 87.834,37.051 87.6,36.817 87.6,35.583 96.2,26.983 96.2,16 J12.B5@97,15.2
USB3-1-TX_N: J12.B9 Module1.169 | length 75.1
  F.Cu w0.127: Module1.169@84.55,68.81 85.013,68.81 85.277,68.546 89.485,68.546 102.11,55.921 102.11,47.279 87.421,32.59 86.673,32.59 86.337,32.254 v1(86.109,32.254)
  B.Cu w0.147: v1(86.109,32.254) 86.109,32.04 85.6,31.531 85.6,29.417 89.825,25.192 89.825,19.884 ccw(c89.583,19.884) 89.583,19.642 ccw(c89.583,19.4) 89.341,19.4 89.341,19.384 ccw(c89.583,19.384) 89.583,19.142 ccw(c89.583,18.9) 89.825,18.9 89.825,16.125 J12.B9@89,15.3
USB3-1-TX_P: J12.B8 Module1.171 | length 73.6
  F.Cu w0.127: Module1.171@84.54,69.2 84.83,69.2 84.84,69.19 85.171,69.19 85.434,68.926 89.642,68.926 102.49,56.079 102.49,47.121 87.579,32.21 86.83,32.21 86.606,31.986 v1(86.606,31.757)
  B.Cu w0.147: v1(86.606,31.757) 86.392,31.757 86,31.365 86,29.583 90.225,25.358 90.225,16.075 J12.B8@91,15.3
USBOTG: J2.10 Module1.101 | length 85
  F.Cu w0.13: J2.10@70.16,88.04 71.4,86.8 71.4,84.1 72.8,82.7 90.8,82.7 v1(91.35,82.15)
  F.Cu w0.147: Module1.101@84.58,55.2 85,55.2 85.2,55 90.9,55 97.6,48.3 98.3,48.3 99.4,49.4 99.4,54.7 v1(91.7,62.4)
  B.Cu w0.13: v1(91.35,82.15) 98.4,75.1
  B.Cu w0.147: v1(91.7,62.4) 98.4,69.1 98.4,75.1
VBAT: BT1.1 Module1.76 | length 154.8
  F.Cu w0.13: BT1.1@11,25.315 16.615,25.315 22.35,31.05 22.35,43.9 20.8,45.45 ; BT1.1@11,48.485 16.915,48.485 19.95,45.45 20.8,45.45 ; v1(27.8,60.2) 22.3,54.7 22.3,46.8 20.95,45.45 20.8,45.45 ; v1(35,66.5) 41,72.5 63.8,72.5 67.2,75.9 82.5,75.9 82.64,76.04 87.76,76.04 87.9,75.9 93.2,75.9 93.32,76.02 97.78,76.02 97.9,75.9 98.3,75.9 104.2,70 Module1.76@115.42,70
  B.Cu w0.13: v1(27.8,60.2) 29.5,60.2 35,65.7 v1(35,66.5)
VBUS: C3.2 C7.2 C8.2 J12.A1 J12.B1 U6.6 | length 80.6
  F.Cu w0.23: 90,15.9 90,14.25 J12.B1@89.5,13.75 ; J12.B1@89.5,13.75 89.15,13.75 87.85,12.45 87.85,11.425 88.575,10.7 89.35,10.7 J12.A1@89.5,10.55 89.95,11 89.95,13.3 J12.B1@89.5,13.75
  F.Cu w0.5: v1(89.1,17) 90.2,18.1 ; 90,15.9 90.2,16.1 90.2,18.1 ; 90.2,20.5 90.2,18.1 ; U6.6@109.45,25.6 110.2,25.6
  F.Cu w1: C3.2@106.9,14.8 v1(107.9,13.8) v1(105.8,13.8) C3.2@106.9,14.9
  F.Cu w2: C3.2@106.9,15.3 110.2,18.6 110.2,25.6
  In2.Cu w0.23: v1(89.1,17) 88.2,16.1 88.2,14.8 89.25,13.75 J12.B1@89.5,13.75
  B.Cu w0.23: J12.A1@89.5,10.35 88.725,10.35 87.825,11.25 87.825,12.075 J12.B1@89.5,13.75
  B.Cu w1: J12.A1@89.5,10.35 89.25,10.1 89.25,7.025 91.375,4.9 100.1,4.9 105.4,10.2 ; v1(105.8,13.8) 105.4,13.4 105.4,10.2 ; 105.4,10.2 107.9,12.7 v1(107.9,13.8) v1(107,13.8) 105.4,12.2 105.4,10.2
VBUS_EN: Module1.111 U6.3 | length 44.8
  F.Cu w0.13: Module1.111@84.54,57.2 85,57.2 85.5,56.7 93.6,56.7 v1(98.9,51.4) ; U6.3@107.55,27.875 106.9,28.525 106.9,40.7 v1(108,41.8)
  B.Cu w0.13: v1(98.9,51.4) 108,42.3 v1(108,41.8)
WL_nDis: J3.1 Module1.89 | length 19.6
  F.Cu w0.13: Module1.89@118.5,72.8 119.8,72.8 128.5,81.5 J3.1@128.5,87.5
pads on no net: H1.Un1 H2.Un1 H3.Un1 H4.Un1 H5.Un1 H6.Un1 H7.Un1 H8.Un1 J2.8 J4.5 J4.6 J4.7 J4.8 J4.11 J4.13 J4.17 J4.19 J4.20 J4.22 J4.23 J4.24 J4.25 J4.26 J4.28 J4.29 J4.30 J4.31 J4.32 J4.34 J4.35 J4.36 J4.37 J4.38 J4.40 J4.42 J4.44 J4.46 J4.48 J4.56 J4.58 J4.67 J4.69 J4.M1 J4.M2 J4.M3 J4.M4 J4.S1 J4.S2 J4.Un1 J4.Un2 J5.MP J7.9 J7.10 J10.14 J11.A8 J11.B8 J11.Un1 J11.Un2 J14.MP J15.NF J16.18 J16.MP J18.NF J22.14 Module1.64 Module1.68 Module1.70 Module1.72 Module1.73 Module1.Un1 Module1.Un2 Module1.Un3 Module1.Un4 SW1.Un1 SW1.Un2 U1.6 U1.7 U1.8 U1.9 U1.10 U2.6 U2.7 U2.8 U2.9 U2.10 U3.Un1 U3.Un2 U5.1 U6.4 U8.2 U8.5 U8.Un1 U8.Un2 U18.3
copper on no net: | length 3.1
  B.Cu w0.23: 72.095,15.85 73.365,17.12 73.365,18.39

## Polygon pours and split planes (outlines as drawn)
GND on F.Cu "F.Cu-GND" (solid, remove dead copper, pour order 8): 179.3,85.325 179.3,91.325 222.8,91.325 225.8,88.325 225.8,5.325 222.8,2.325 69.8,2.325 66.8,5.325 66.8,69.075 66.8,80.2 66.8,88.325 69.8,91.325 163.3,91.325 163.3,85.325
M2_3v3 on F.Cu "F.Cu-/PCIe-M2/M2_3v3-1" (solid, remove dead copper, pour order 3): 156.8,9.7 152.3,9.7 152.3,10.8 151.7,11.4 145.9,11.4 143.1,11.4 143.1,19.4 152.7,19.4 156.8,15.3
+5v on F.Cu "F.Cu-/+5v" (solid, remove dead copper, pour order 7): 123,25.1 123.5,24.6 124.7,24.6 125.6,25.5 125.6,31.6 128.7,34.7 128.6,69.4 125.5,72.5 118.6,72.5 118.6,70.3 119.4,70.3 123,66.7
M2_3v3 on F.Cu "F.Cu-/PCIe-M2/M2_3v3" (solid, remove dead copper, pour order 2): 134.1,24.8 134.1,16.4 133,15.1 133,14.3 134.6,14.3 138.2,10.7 138.2,9.1 139.7,9.1 139.7,11 140.1,11.4 143.1,11.4 143.1,12.6 143.1,24.8
GND on In1.Cu "In1.Cu-GND" (solid, remove dead copper, pour order 9): 97,89.482 97,83.518 113,83.5 113,89.459 156.5,89.5 159.5,86.5 159.5,3.5 156.5,0.5 132.5,0.5 3.5,0.5 0.5,3.5 0.5,67.25 0.5,78.375 0.5,86.5 3.5,89.5
GND on In2.Cu "In2.Cu-GND" (solid, remove dead copper, pour order 10): 113,83.5 113,89.5 140,89.5 156.5,89.5 159.5,86.5 159.5,3.5 156.5,0.5 132.5,0.5 3.5,0.5 0.5,3.5 0.5,86.5 3.5,89.5 97,89.5 97,83.5
VBUS on B.Cu "B.Cu-/CM5_HighSpeed/VBUS" (solid, remove dead copper, pour order 6): 90.1,14.2 88.6,14.2 87.3,12.9 87.3,10.6 88.3,9.6 88.3,3.8 89,3.1 100.9,3.1 103.1,5.3 103.1,6.4 108.4,11.7 108.4,14.4 103.9,14.4 103.4,13.9 103.5,12.8 101.5,10.8 98.6,7.8 91.6,7.8 90.1,9.3 90.1,13.1
+5v on B.Cu "B.Cu-/+5v" (solid, remove dead copper, pour order 5): 104.9,6.7 110.8,6.7 113.9,9.8 113.9,13.8 125.6,25.5 125.6,29.7 109.6,29.7 109.6,15.6 109.2,15.2 109.2,13.8 108.3,12.9 108.3,10.8 106.5,9 105.7,9 104.9,8.2
GND on B.Cu "B.Cu-GND" (solid, remove dead copper, pour order 11): 159.5,86.5 159.5,3.5 156.5,0.5 3.5,0.5 0.5,3.5 0.5,86.5 3.5,89.5 97,89.5 97,83.5 113,83.5 113,89.5 156.5,89.5

## Keep-outs
Edge.Cuts:
  lines w0: 0,3.5 ccw(c3.5,3.5) 3.5,0 156.5,0 ccw(c156.5,3.5) 160,3.5 160,86.5 ccw(c156.5,86.5) 156.5,90 3.5,90 ccw(c3.5,86.5) 0,86.5 0,3.5
  lines w0.254: 0,3.5 ccw(c3.5,3.5) 3.5,0 156.5,0 ccw(c156.5,3.5) 160,3.5 160,86.5 ccw(c156.5,86.5) 156.5,90 3.5,90 ccw(c3.5,86.5) 0,86.5 0,3.5

## Silkscreen, mask and mechanical layers (free items; w line width, h text height)
F.SilkS:
  lines w0.127: 82.7,65 83,65 ; 83,64.7 83,65 ; 83,65.3 83,65 ; 83.3,65 83,65 ; 116.7,65 117,65 ; 117,64.7 117,65 ; 117,65.3 117,65 ; 117.3,65 117,65
  lines w0.254: 57.1,77.6 59.5,77.6 60,77.6 60,79 ; 59.6,78.6 60,79 ; 60.4,78.6 60,79 ; 62.1,75.5 62.5,75.5 62.5,79 ; 62.1,78.6 62.5,79 ; 62.9,78.6 62.5,79 ; 80,85.3 80,90 83.5,90 ; 113.2,78.5 114.7,78.5 ; 113.2,80.9 114.7,80.9 ; 114.3,78.1 114.7,78.5 ; 114.3,80.5 114.7,80.9 ; 114.3,81.3 114.7,80.9 ; 6.9,15.1 6.9,22.1 ; 6.9,15.1 6.9,22.1 ; 6.9,15.1 13.9,15.1 13.9,21.1 13.9,22.1 6.9,22.1 ; 114.7,78.5 114.3,78.9 114.7,78.5 ; 41,61.5 41.8,61.5 41.8,65.5 41,65.5 41,61.5 ; 43.5,61.5 44.3,61.5 44.3,65.5 43.5,65.5 43.5,61.5 ; 59.6,79.6 60.4,79.6 60.4,83.6 59.6,83.6 59.6,79.6 ; 62.1,79.6 62.9,79.6 62.9,83.6 62.1,83.6 62.1,79.6
  text "J3 : nBT_Dis GND" at 88.885,87.36 h1
  text "nWireless_Dis" at 103.203,87.36 h1
  text "J5" at 20.25,85.05 h1
  text "J16" at 36.05,84.85 h1
  text "USB_OTG" at 63.683,83.55 h1 r270
  text "PMIC_Enable" at 71.283,83.55 h1 r270
  text "SYNC_Out" at 70.417,83.25 h1 r90
  text "PWR_Button" at 75.417,83.25 h1 r90
  text "FAN" at 124.153,81.55 h1
  text "CAM/DISP 1" at 43.413,80.379 h1
  text "CAM/DISP 0" at 7.098,80.279 h1
  text "Power Button" at 24.35,80.25 h1
  text "Fit for 1.8V GPIO" at 100.527,80.226 h1
  text "Fit for 3.3V GPIO" at 100.423,77.826 h1
  text "Fit jumper to disable eMMC Boot" at 30.35,76.76 h1
  text "Fit jumper to disable writing to EEPROM" at 30.35,74.56 h1
  text "Fit two jumpers  / for CAM/DISP 1" at 44.9,61.708 h1
  text "Raspberry Pi HAT" at 12.05,56.3 h1.5
  text "Compute Module 5" at 91.35,51.3 h1.5
  text "Compute Module 5 IO Board" at 59.8,28.317 h1.5
  text "Ethernet" at 69.35,24.7 h1.5
  text "Battery / CR2032" at 0.839,22.804 h1
  text "NB SD card / only used for  / CM5 modules  / without eMMC" at 110.6,20.12 h1
  text "SD card" at 110.55,17.85 h1.5
  text "USB3" at 93.85,17.1 h1.5
  text "POE" at 60.098,14.75 h1
  text "HDMI0" at 19.95,12.6 h1.5
  text "HDMI1" at 45.25,12.6 h1.5
  text "Power In" at 102.35,11.55 h1.5
  text "USB Device" at 104.129,9.726 h1
  text "Rev 1" at 20.326,3.75 h1.5
  text "Made in PRC" at 84.674,0.35 h1 r90
Dwgs.User:
  lines w0.254: -13.2,67.5 -0.5,67.5

## Dimensions
48,-9 to 23,-9 on Dwgs.User
33.7,1.1 to 37.35,1.1 on Dwgs.User
0,85 to 11.5,85 on Dwgs.User
93,2.6 to 108,2.6 on Dwgs.User
33.7,0.85 to 37.35,0.85 on Dwgs.User
0,3.5 to 61.5,3.5 on Dwgs.User
74,-9 to 48,-9 on Dwgs.User
11,0 to 11,77 on Dwgs.User
160,0 to 0,0 on Dwgs.User
-4,0 to -4,3.5 on Dwgs.User
-12.7,0 to -12.7,67.5 on Dwgs.User
11,0.35 to 33.7,0.35 on Dwgs.User
132.5,1.1 to 121.25,1.1 on Dwgs.User
3.5,-7 to 23,-7 on Dwgs.User
-4,90 to -4,0 on Dwgs.User
3.5,-9 to 0,-9 on Dwgs.User
11,1.1 to 33.7,1.1 on Dwgs.User
11.5,92 to 29.5,92 on Dwgs.User
108,-5 to 121.25,-5 on Dwgs.User
74,-3.5 to 93,-3.5 on Dwgs.User
-8.5,0 to -8.5,52.5 on Dwgs.User
11,0 to 11,8 on Dwgs.User
11.5,89.6 to 47.5,89.6 on Dwgs.User
0,77 to 11,77 on Dwgs.User

## Text inside footprints (layer, text, board x,y; h text height)
D1: F.SilkS "+" at 31.6,1.4 h0.76 r270
D2: F.SilkS "+" at 35.25,1.4 h0.76 r270
D3: F.SilkS "+" at 130.4,1.4 h0.76 r270
J4: F.SilkS "2242" at 154.606,46.142 h1; F.SilkS "M.2 M Key" at 151.3,12.233 h1; F.SilkS "2260" at 154.606,64.142 h1; F.SilkS "2280" at 154.739,83.954 h1; F.SilkS "2230" at 154.356,34.142 h1
J11: Dwgs.User "PCB Edge" at 106.252,-1.058 h0.5